# Altium PCB ffultra_pcb.PcbDoc (part 1 of 3)
Units mm, origin at the board's own origin, x right, y up, seen from the top; angles counter-clockwise.
Board outline 28 x 55 mm, 6 copper layers (Top, GND-T, Inner, Power, GND-B, Bottom), stack 1.538 mm thick; 121 components, 88 nets, 471 pads, 349 vias.
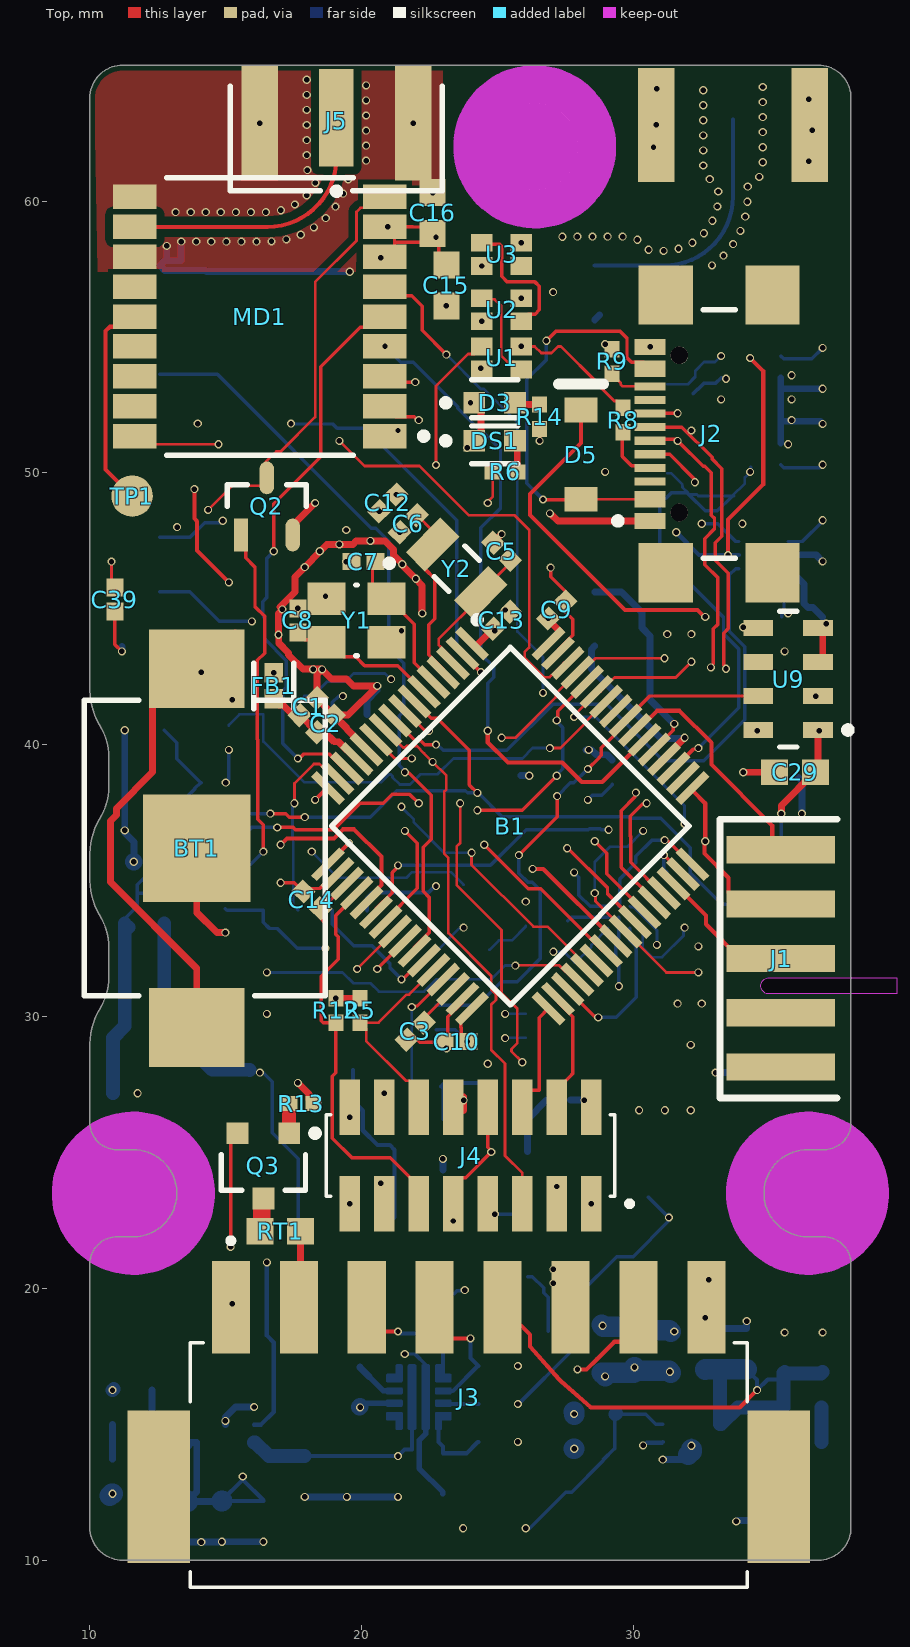
[diagram p0: Top view]
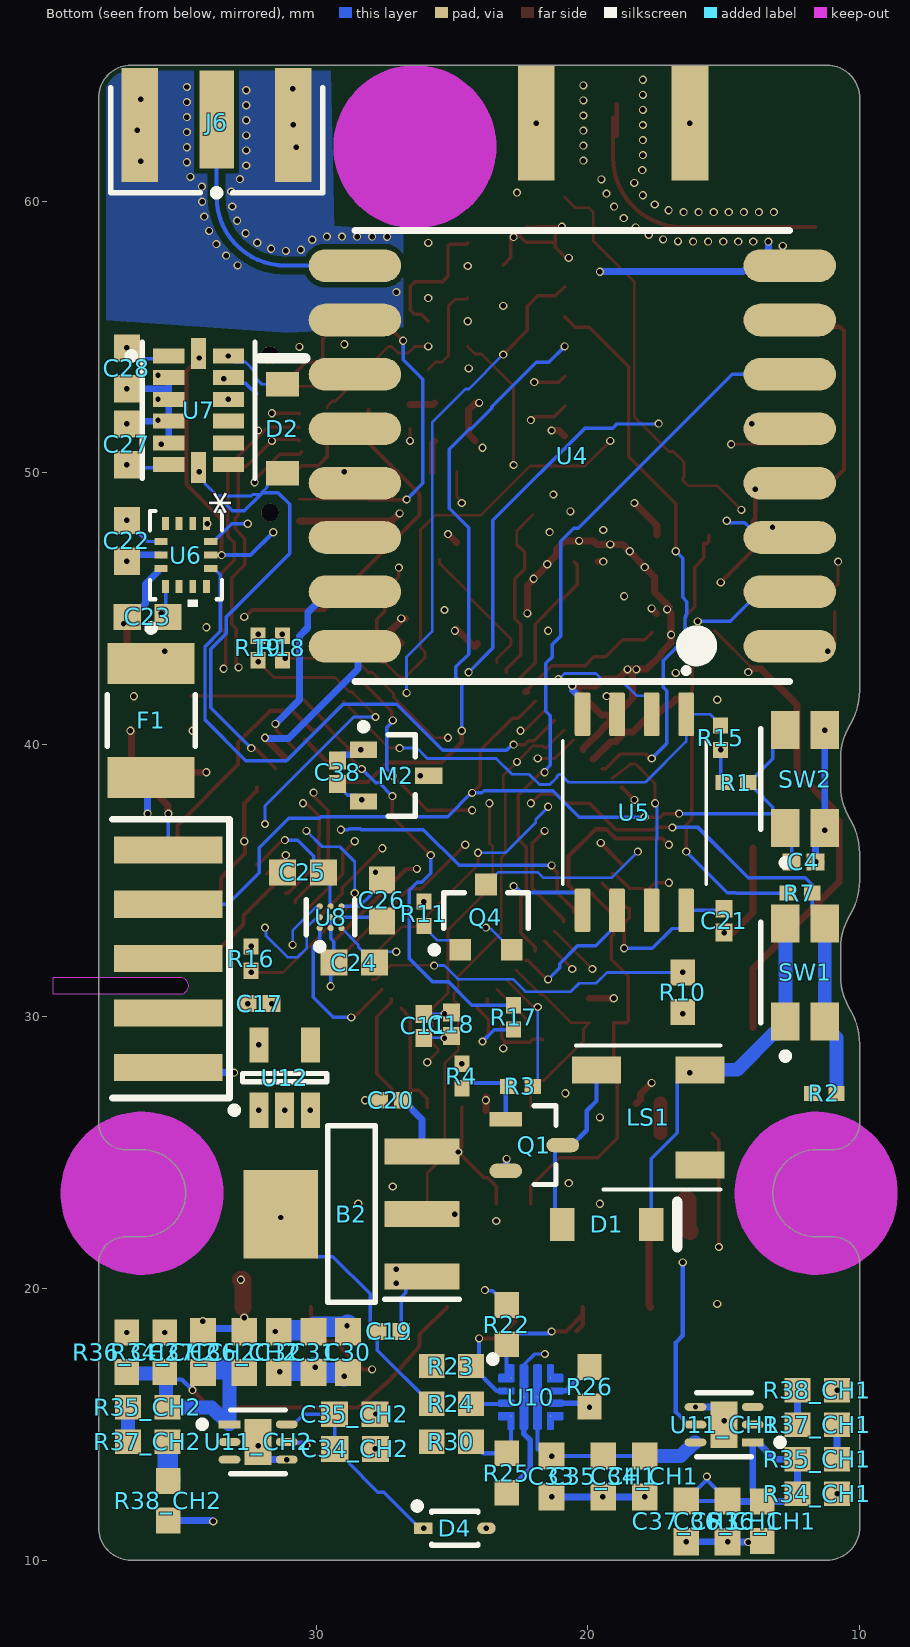
[diagram p1: Bottom view, seen from below]
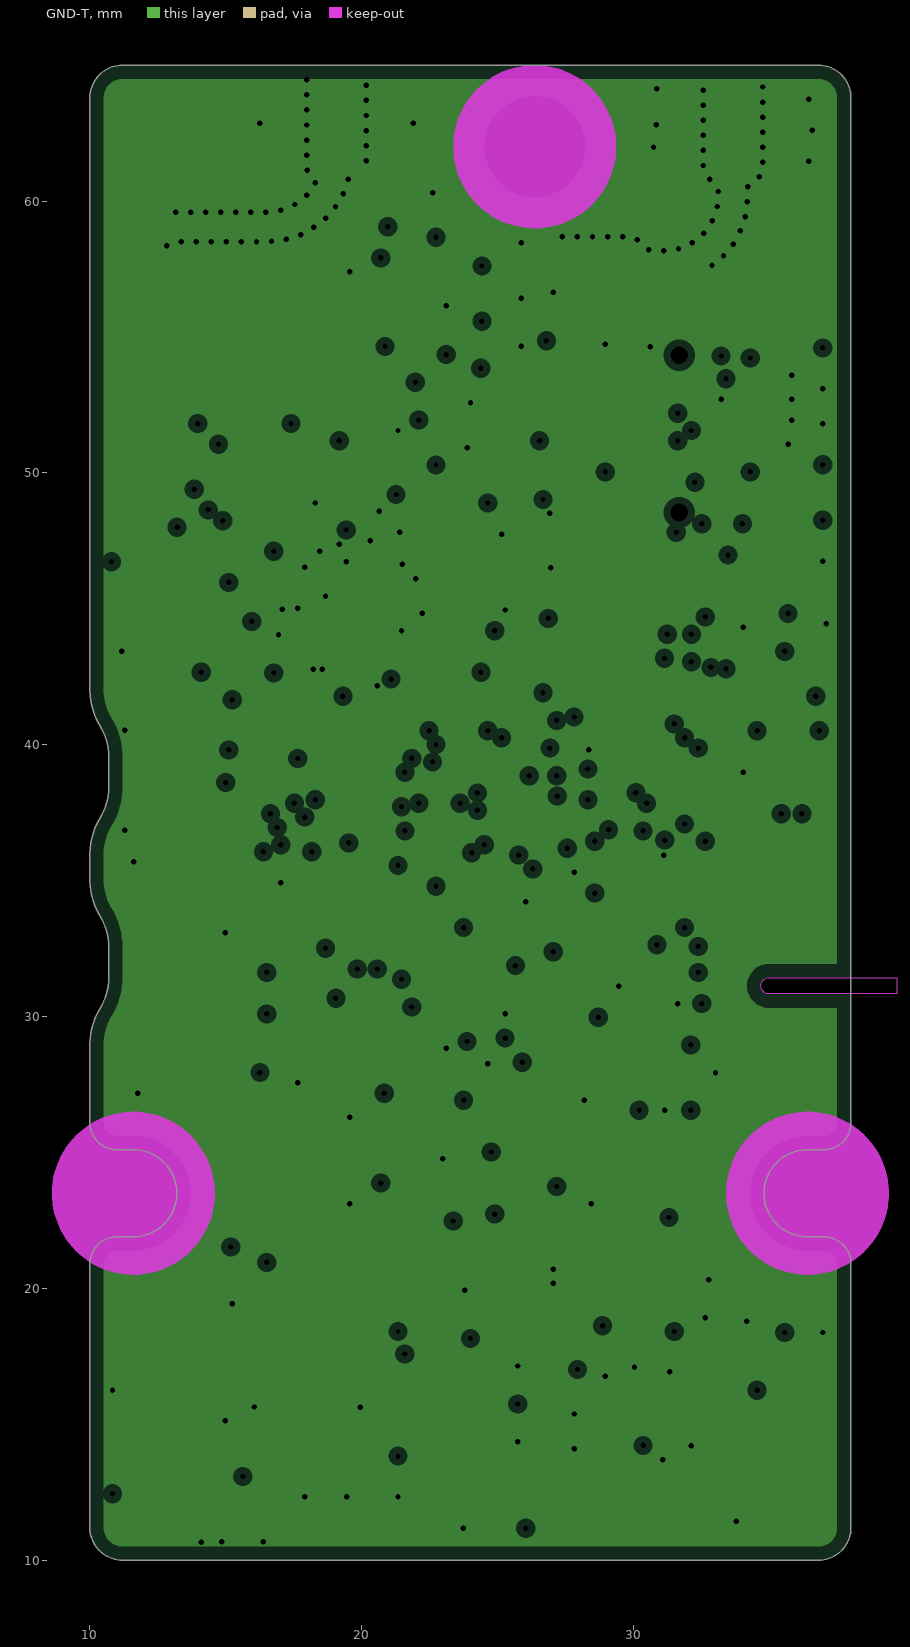
[diagram p2: GND-T, clearances drawn from the general rule]
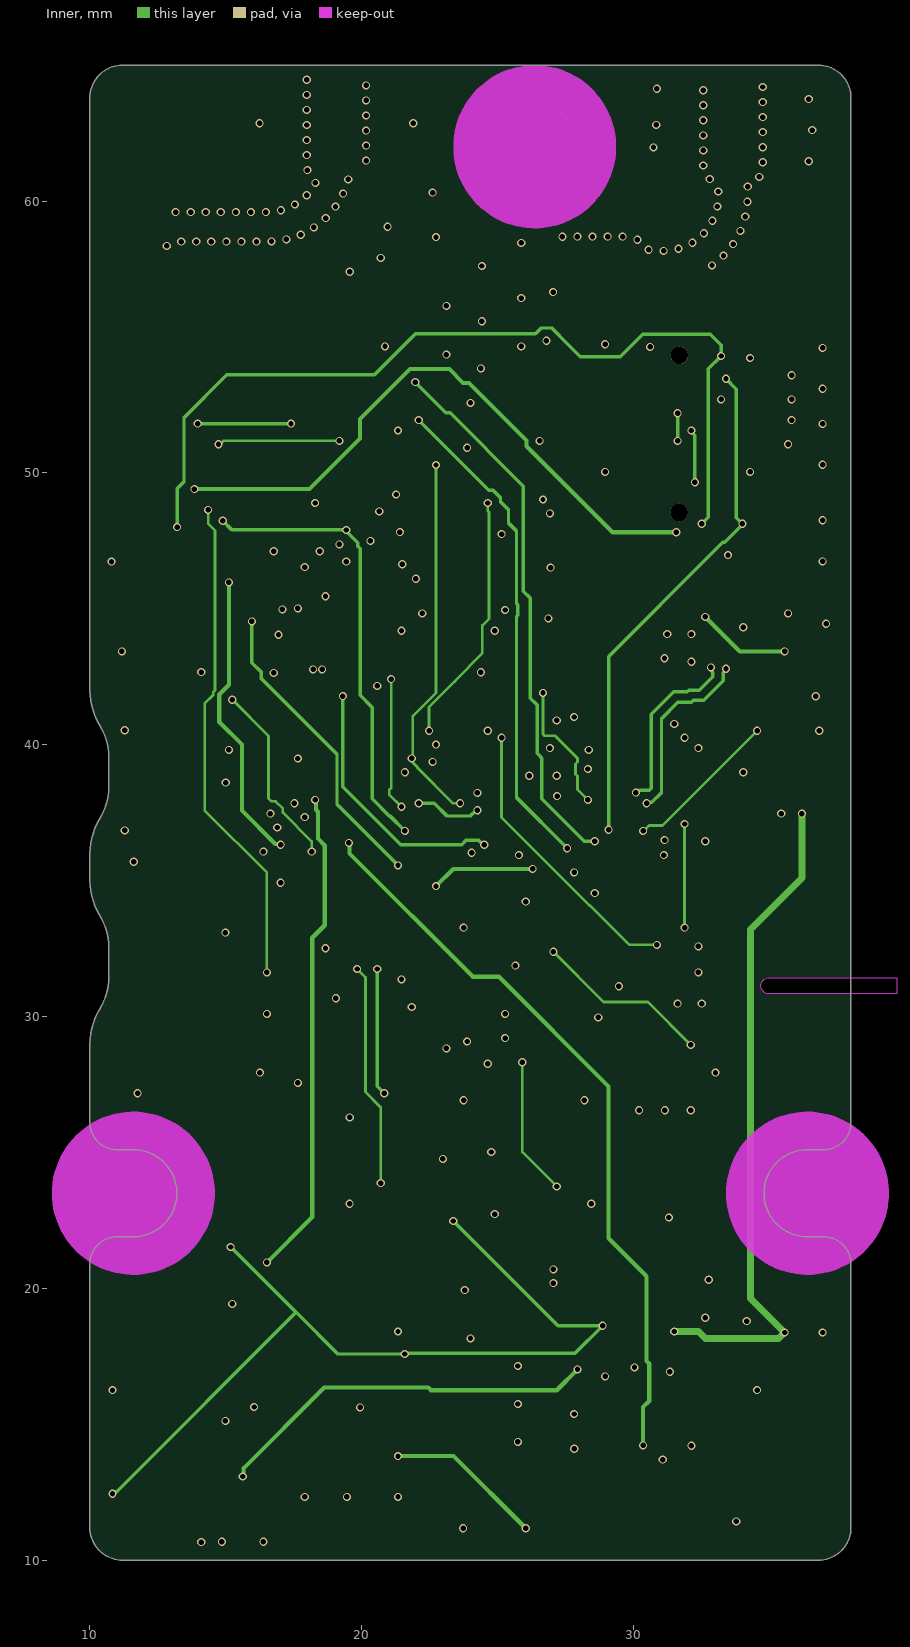
[diagram p3: Inner]
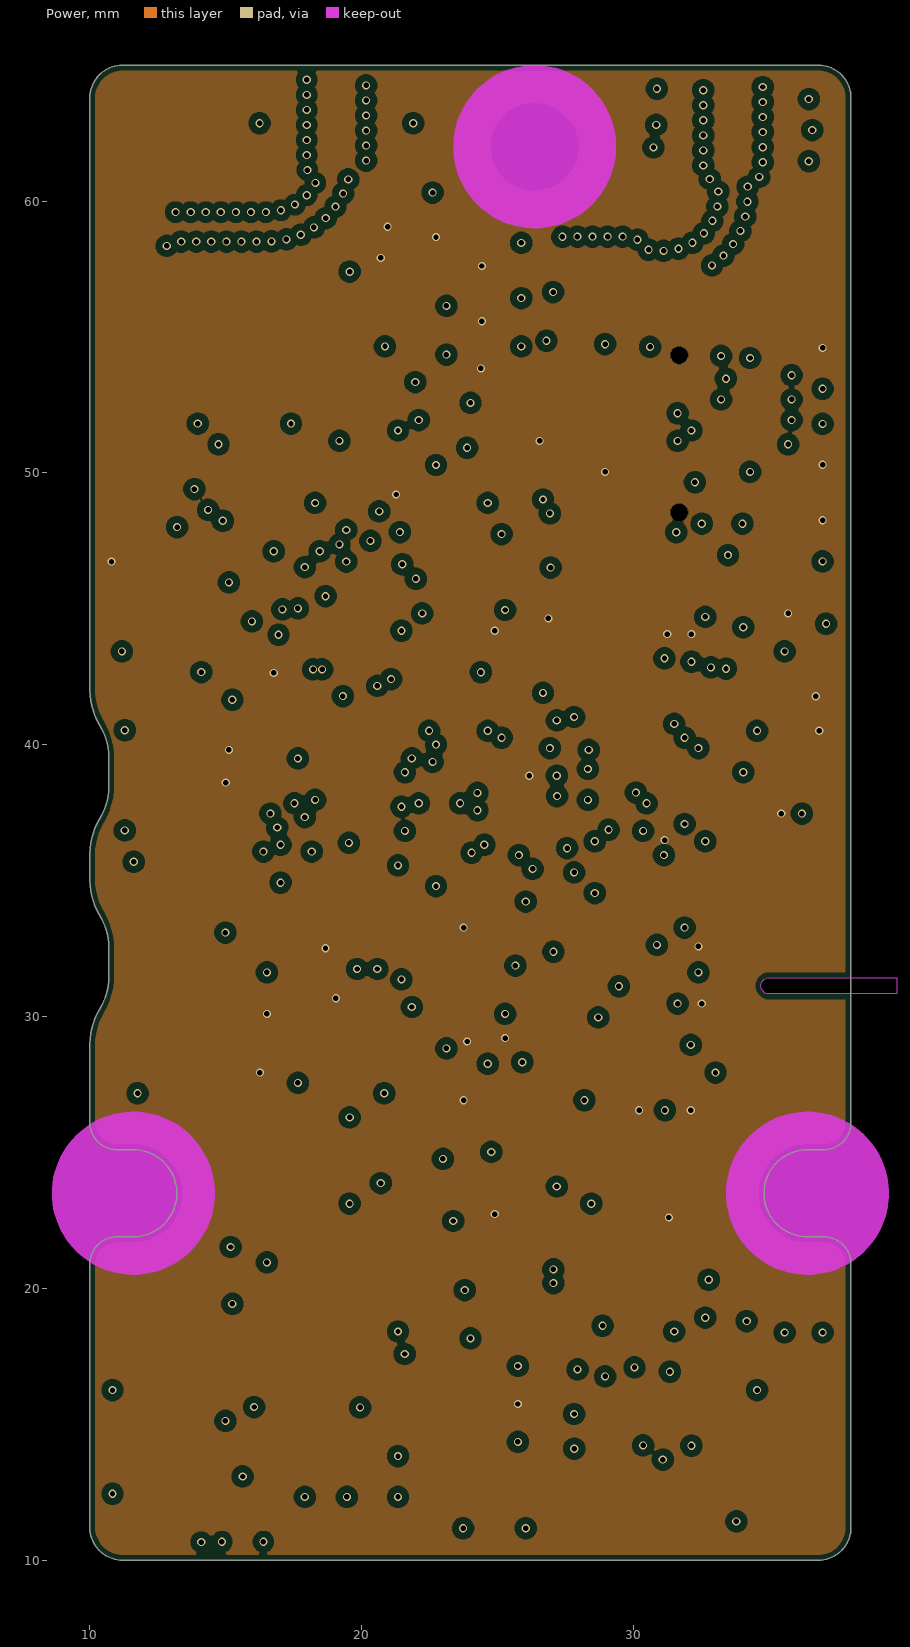
[diagram p4: Power]
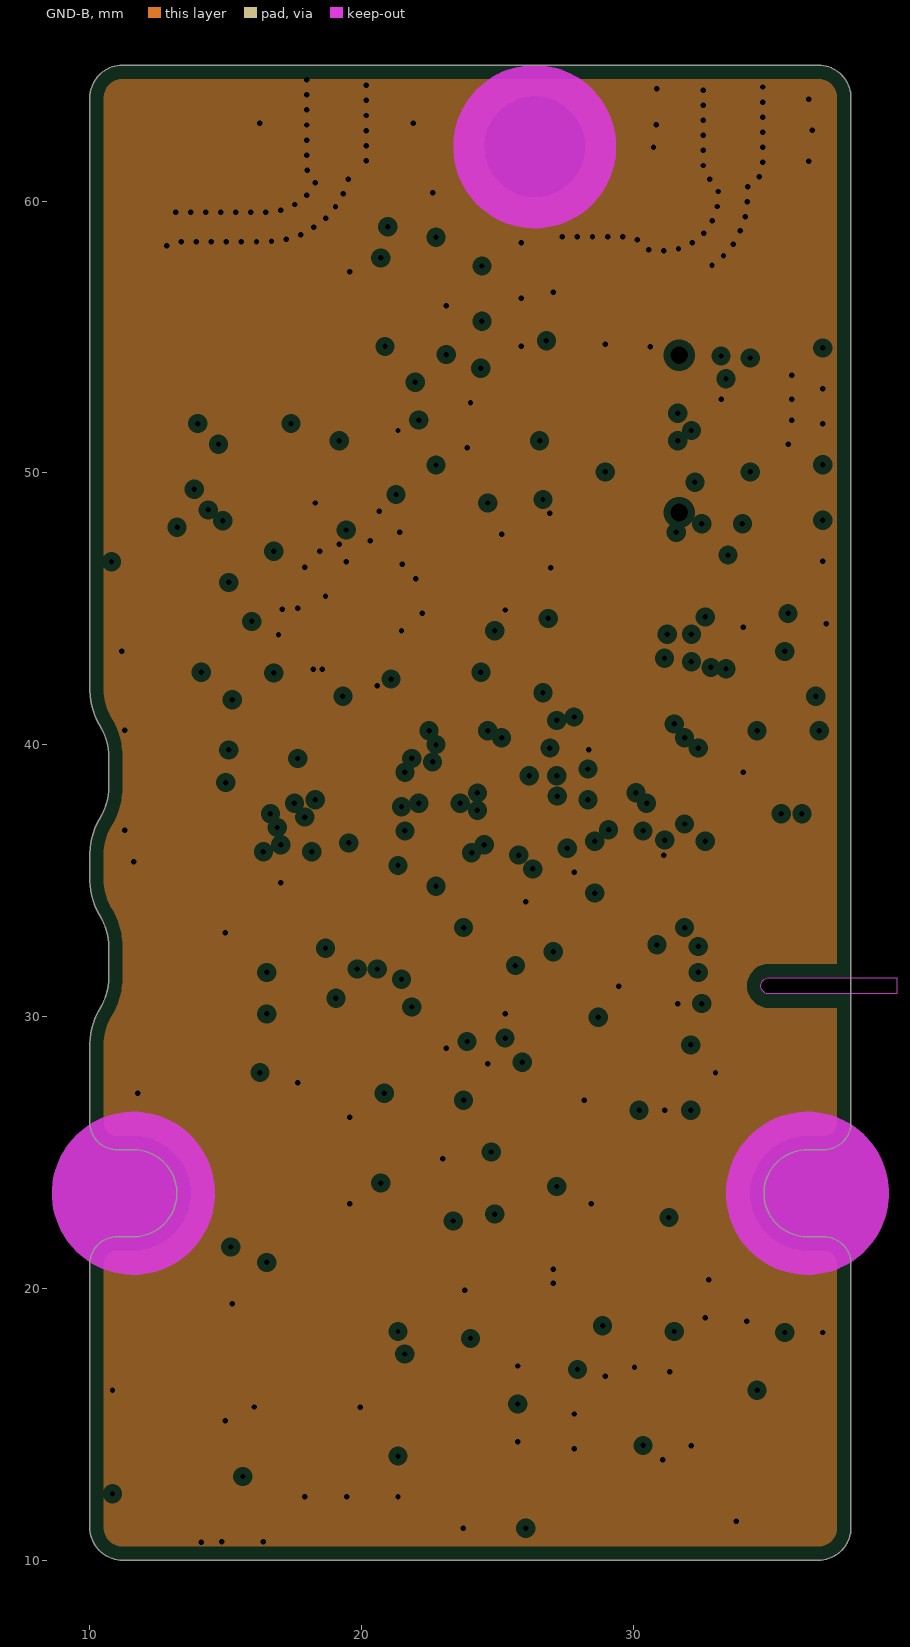
[diagram p5: GND-B, clearances drawn from the general rule]

## Layer stack, top to bottom
Top Solder: solder mask 0.0305, SM-001, Dk 3.8
Top: signal copper 0.035
Dielectric 4: prepreg 0.0994, 3313, Dk 4.05
GND-T: plane copper 0.0152, net GND
Dielectric 2: core 0.55, Core-009, Dk 4.6
Inner: signal copper 0.0152
Dielectric 1: prepreg 0.1088, 2116, Dk 4.25
Power: signal copper 0.0152
Dielectric 3: core 0.55, Core-009, Dk 4.6
GND-B: plane copper 0.0152, net GND
Dielectric 5: prepreg 0.0994, 3313, Dk 4.05
Bottom: signal copper 0.035
Bottom Solder: solder mask 0.0305, SM-001, Dk 3.8

## Board outline
10,26.1 10,29 cw(c12.407,29) 10.35,30.25 ccw(c8.293,31.5) 10.7,31.5 10.7,32.5 ccw(c8.293,32.5) 10.35,33.75 cw(c12.407,35) 10,35 10,36 cw(c12.407,36) 10.35,37.25 ccw(c8.293,38.5) 10.7,38.5 10.7,39.5 ccw(c8.293,39.5) 10.35,40.75 cw(c12.407,42) 10,42 10,63.8 cw(c11.2,63.8) 11.2,65 36.8,65 cw(c36.8,63.8) 38,63.8 38,26.1 cw(c37,26.1) 37,25.1 36.4,25.1 ccw(c36.4,23.5) 36.4,21.9 37,21.9 cw(c37,20.9) 38,20.9 38,11.2 cw(c36.8,11.2) 36.8,10 11.2,10 cw(c11.2,11.2) 10,11.2 10,20.9 cw(c11,20.9) 11,21.9 11.6,21.9 ccw(c11.6,23.5) 11.6,25.1 11,25.1 cw(c11,26.1)

## Design rules (kind name [scope] priority, off if disabled: settings)
BoardOutlineClearance [All] p1: gap=0.2 ignorepadtopadclearanceinfootprint=FALSE except(0: Text-OutlineEdge Text-CavityEdge Text-CutoutEdge Text-SplitBarrior Text-SplitContinuation)
Clearance [All] p1: gap=0.254 ignorepadtopadclearanceinfootprint=TRUE except(0: Arc-Hole Track-Hole SMDPad-Hole THPad-Hole Via-Hole Fill-Hole Poly-Hole Region-Hole Text-Hole; 0.09: Arc-Arc Arc-Track Track-Track; 0.127: SMDPad-SMDPad; 0.2: Arc-SMDPad Track-SMDPad SMDPad-Fill SMDPad-Poly SMDPad-Region Fill-Fill Fill-Poly Fill-Region Poly-Poly Poly-Region Region-Region; 0.33: Arc-THPad Track-THPad; 0.5: THPad-THPad)
DiffPairsRouting [All] p1: maxlimit=0.254 minlimit=0.09 mostfreqgap=0.254 toplayer_minwidth=0.09 toplayer_maxwidth=0.381 toplayer_prefwidth=0.254 midlayer2_minwidth=0.09 midlayer2_maxwidth=0.381 midlayer2_prefwidth=0.254 midlayer3_minwidth=0.09 midlayer3_maxwidth=0.381 midlayer3_prefwidth=0.254 bottomlayer_minwidth=0.09 bottomlayer_maxwidth=0.381 bottomlayer_prefwidth=0.254 maxuncoupledlength=12.7
HoleSize [All] p1: absolutevalues=TRUE maxlimit=6.3 minlimit=0.2 maxpercent=80.000 minpercent=20.000
MatchedLengths "Schematic Matched Net Lengths" [InNetClass('STLINK')] p1: tolerance=0.1 checknetsindiffpair=FALSE checkdiffpairvsdiffpair=TRUE checkxsignals=TRUE checkothers=TRUE
MinimumSolderMaskSliver [All] p1: minsoldermaskwidth=0.09
PlaneClearance [All] p1: clearance=0.254
PlaneConnect [All] p1: pad.planeconnectstyle=Relief pad.reliefexpansion=0.254 pad.reliefentries=4 pad.reliefconductorwidth=0.254 pad.reliefairgap=0.254 via.planeconnectstyle=Direct via.reliefexpansion=0.508 via.reliefentries=4 via.reliefconductorwidth=0.254 via.reliefairgap=0.254
PolygonConnect PolygonConnect_gnd_ant [IsNamedPolygon('GND_ANT')] p1: thpad.connectstyle=Relief thpad.reliefconductorwidth=0.254 thpad.reliefentries=4 thpad.polygonreliefangle="90 Angle" thpad.airgapwidth=0.254 smdpad.connectstyle=Relief smdpad.reliefconductorwidth=0.5 smdpad.reliefentries=4 smdpad.polygonreliefangle="90 Angle" smdpad.airgapwidth=0.127 via.connectstyle=Direct via.reliefconductorwidth=0.254 via.reliefentries=4 via.polygonreliefangle="90 Angle" via.airgapwidth=0.254
PolygonConnect [All] p2: thpad.connectstyle=Relief thpad.reliefconductorwidth=0.254 thpad.reliefentries=4 thpad.polygonreliefangle="90 Angle" thpad.airgapwidth=0.254 smdpad.connectstyle=Direct smdpad.reliefconductorwidth=0.254 smdpad.reliefentries=4 smdpad.polygonreliefangle="90 Angle" smdpad.airgapwidth=0.254 via.connectstyle=Direct via.reliefconductorwidth=0.254 via.reliefentries=4 via.polygonreliefangle="90 Angle" via.airgapwidth=0.254
RoutingVias [All] p1: holewidth=0.2 width=0.35 viastyle="Through Hole" minholewidth=0.15 minwidth=0.25 maxholewidth=0.711 maxwidth=1.27 useviatemplates=TRUE viatemplateguid#1={D842139F-6F32-4212-9B27-BAE97ACFDABE} viatemplateguid#2={DD1D606A-29FF-4885-8C69-D1AE082B58F4} viatemplatename#1=v30h20 viatemplatename#2=v35h20
SolderMaskExpansion SolderMaskExpansion_via [IsVia] p1: expansion=0.102 istentingtop=TRUE
SolderMaskExpansion [All] p2: expansion=0.05 istentingtop=FALSE
SupplyNets "Schematic Supply Nets_3" [InNet('1V8')] p1: voltage=0.000
SupplyNets "Schematic Supply Nets_5" [InNet('VBAT')] p2: voltage=0.000
SupplyNets "Schematic Supply Nets_2" [InNet('3V3')] p3: voltage=0.000
SupplyNets "Schematic Supply Nets_1" [InNet('GND')] p4: voltage=0.000
SupplyNets "Schematic Supply Nets" [InNet('VDDA')] p5: voltage=0.000
Width Width_ANT [InNet('GPS_ANT','RD_ANT')] p1: maxlimit=0.154 minlimit=0.132 preferedwidth=0.154 toplayer_minwidth=0.154 bottomlayer_minwidth=0.154 impedanceprofiledriven=TRUE impedanceprofileid={4A9DADD4-1E54-47D4-9708-552C67BF1AE2} impedanceprofilevalue=50.000000 minimp=50.000000 maximp=50.000000 favimp=50.000000
Width [All] p2: maxlimit=0.76 minlimit=0.1 preferedwidth=0.254 minimp=50.000000 maximp=50.000000 favimp=50.000000
25 further rules are at their usual default settings.

## Classes and differential pairs
channel class ffultra_p2_channel: CH1 CH2
component class PyroDesignator: R22 R23
component class Pressure: C29 U9
component class P1: C30 C31 C32 C33 D4 R24 R25 R26 R30 U10
component class IMU: C22 C23 C24 C25 C26 C27 C28 D2 U6 U7 U8 U12
component class CH2: C34_CH2 C35_CH2 C36_CH2 C37_CH2 R34_CH2 R35_CH2 R36_CH2 R37_CH2 R38_CH2 U11_CH2
component class CH1: C34_CH1 C35_CH1 C36_CH1 C37_CH1 R34_CH1 R35_CH1 R36_CH1 R37_CH1 R38_CH1 U11_CH1
net class STLINK: SWCLK SWDIO SWO
net class QSPI: "Flash CLK" "Flash IO 0" "Flash IO 1" "Flash IO 2" "Flash IO 3" "Flash NCS"
component class Storage: C21 R15 U5
component class Power: B2 C19 C20 D3 D5 F1 Q3 R13 R14 RT1
component class Wireless: BT1 C15 C16 C17 C18 C38 C39 J5 J6 M2 MD1 Q2 Q4 R7 R10 R11 TP1 U4
component class Connectors: 32 J2 J3 J4 R8 R9
component class MCU: B1 C1 C2 C3 C4 C5 C6 C7 C8 C9 C10 C11 C12 C13 C14 D1 DS1 FB1 J1 LS1 Q1 R1 R2 R3 R4 R5 R6 R12 R16 R17 R18 R19 SW1 SW2 U1 U2 U3 Y1 Y2
differential pair USB_Data: +USB_Data_P -USB_Data_N

## Components (designator, comment, footprint, x,y, rotation, side; value= is the part's Value field where it differs from the comment)
B1 "STM32F412RGT6" QFP50P1200X1200X160-64N 25.467,37.01 r315 top
B2 "LDL1117S33R" SOT230P700X180-4N 28.702,22.733 r0 bottom
BT1 "3030" FP-3030-MFG 14.224,36.195 r90 top
C1 "CL05B104KO5NNNC" CAP-0402 18.034,41.402 r225 top value=100nF
C2 "CL05A105KA5NQNC" CAP-0402 18.669,40.767 r225 top value=1µF
C3 "CL05A475MP5NRNC" CAP-0402 21.971,29.464 r45 top value=4.7µF
C4 "CL05B104KO5NNNC" CAP-0402 12.065,35.687 r0 bottom value=100nF
C5 "C1005NP0439CGTS" CAP-0402 25.146,47.117 r315 top value=4.3pF
C6 "C1005NP0439CGTS" CAP-0402 21.717,48.133 r45 top value=4.3pF
C7 "0402CG6R0C500NT" CAP-0402 20.066,46.736 r0 top value=6pF
C8 "0402CG6R0C500NT" CAP-0402 17.653,44.577 r270 top value=6pF
C9 "CL05A475MP5NRNC" CAP-0402 27.178,44.958 r225 top value=4.7µF
C10 "CL05B104KO5NNNC" CAP-0402 23.495,29.083 r0 top value=100nF
C11 "CL05B104KO5NNNC" CAP-0402 26.035,29.659 r270 bottom value=100nF
C12 "CL05B104KO5NNNC" CAP-0402 20.955,48.895 r45 top value=100nF
C13 "CL05B104KO5NNNC" CAP-0402 25.146,44.577 r225 top value=100nF
C14 "CL05B104KO5NNNC" CAP-0402 18.161,34.29 r315 top value=100nF
C15 "CL10A106KP8NNNC" CAP-0603 23.114,56.896 r90 top value=100pF
C16 "CC0603KRX7R9BB104" CAP-0603 22.606,59.563 r270 top value=100nF
C17 "CL05A106MQ5NUNC" CAP-0402 32.072,30.48 r0 bottom value=10µF
C18 "CL05B104KO5NNNC" CAP-0402 25.019,29.718 r270 bottom value=100nF
C19 "CL05A475MP5NRNC" CAP-0402 27.305,18.415 r0 bottom value=4.7µF
C20 "CL05A105KA5NQNC" CAP-0402 27.246,26.924 r180 bottom value=1µF
C21 "CL05B104KO5NNNC" CAP-0402 14.986,33.528 r90 bottom value=100nF
C22 "CC0603KRX7R9BB104" CAP-0603 36.957,47.498 r90 bottom value=100nF
C23 "CC0603KRX7R9BB104" CAP-0603 36.195,44.704 r180 bottom value=100nF
C24 "CC0603KRX7R9BB104" CAP-0603 28.594,31.985 r180 bottom value=100nF
C25 "CC0603KRX7R9BB104" CAP-0603 30.48,35.306 r180 bottom value=100nF
C26 "CL10A225KO8NNNC" CAP-0603 27.578,34.271 r270 bottom value=2.2µF
C27 "CL10A105KB8NNNC" CAP-0603 36.957,51.054 r270 bottom value=1µF
C28 "CC0603KRX7R9BB104" CAP-0603 36.957,53.848 r90 bottom value=100nF
C29 "CC0603KRX7R9BB104" CAP-0603 35.941,38.989 r0 top value=100nF
C30 "CL10A226MQ8NRNC" CAP-0603 28.829,17.653 r90 bottom value=22µF
C31 "CL10A226MQ8NRNC" CAP-0603 30.099,17.653 r90 bottom value=22µF
C32 "CL10A105KB8NNNC" CAP-0603 31.369,17.653 r90 bottom value=1µF
C33 "CL10A225KO8NNNC" CAP-0603 21.336,13.081 r90 bottom value=2.2µF
C34_CH1 "CL10A226MQ8NRNC" CAP-0603 17.907,13.081 r90 bottom value=22µF (schematic designator C34)
C34_CH2 "CL10A226MQ8NRNC" CAP-0603 28.563,14.097 r0 bottom value=22µF (schematic designator C34)
C35_CH1 "CL10A226MQ8NRNC" CAP-0603 19.431,13.081 r90 bottom value=22µF (schematic designator C35)
C35_CH2 "CL10A226MQ8NRNC" CAP-0603 28.575,15.367 r0 bottom value=22µF (schematic designator C35)
C36_CH1 "CL10A225KO8NNNC" CAP-0603 14.859,11.43 r90 bottom value=2.2µF (schematic designator C36)
C36_CH2 "CL10A225KO8NNNC" CAP-0603 32.639,17.653 r270 bottom value=2.2µF (schematic designator C36)
C37_CH1 "CL10A225KO8NNNC" CAP-0603 16.383,11.43 r90 bottom value=2.2µF (schematic designator C37)
C37_CH2 "CL10A225KO8NNNC" CAP-0603 34.163,17.653 r270 bottom value=2.2µF (schematic designator C37)
C38 "GRM155C71A105KE11D" CAP-0402 29.21,38.989 r90 bottom value=1µF
C39 "GRM155C71A105KE11D" CAP-0402 10.922,45.339 r270 top value=1µF
D1 "SM4007PL-TP" MCC-SOD-123FL_V 19.304,22.352 r180 bottom
D2 "SM4007PL-TP" MCC-SOD-123FL_V 31.238,51.625 r90 bottom
D3 "Red LED" FP-LTST-C190GKT-MFG 24.892,52.578 r0 top
D4 "1N5819WS" FP-477-02-IPC_C 24.892,11.176 r180 bottom
D5 "SM4007PL-TP" MCC-SOD-123FL_V 28.067,50.673 r90 top
DS1 "Red LED" FP-LTST-C190GKT-MFG 24.892,51.181 r0 top
F1 "MF-MSMF050" BOUR-MF-MSMF050-2_V 36.068,40.894 r270 bottom
FB1 "BLM15AG601SN1D" FP-BLM15-0_05-IPC_A 16.764,42.164 r90 top
J1 "009159010061911" 009159010061911-Footprint-1 35.687,32.131 r270 top
J2 "TYPE-C16PQTWT" FP-USB4110-GF-A-MFG 34.29,51.435 r90 top
J3 "1771088" PHOENIX_1771088 13.686,9.004 r0 top
J4 "20021321-00016C4LF" AMPHENOL_20021321-00016C4LF 24.003,24.889 r0 top
J5 "SMA-J-P-H-ST-EM1" FP-SMA-J-P-H-ST-EM1-MFG 19.07,69.725 r180 top
J6 "SMA-J-P-H-ST-EM1" FP-SMA-J-P-H-ST-EM1-MFG 33.659,69.665 r0 bottom
LS1 "MLT-5020" MLT-5020 17.78,26.289 r0 bottom
M2 "XC6206P332MR-G" SOT95P245X110-3N 27.051,38.862 r180 bottom
MD1 "TESEO-LIV4F" FP-LCC-18-MFG 16.256,55.753 r180 top
Q1 "AO3400A" FP-SOT23-IPC_C 21.971,25.273 r180 bottom
Q2 "AO3400A" FP-SOT23-IPC_C 16.51,48.768 r90 top
Q3 "AO3401A" AO-SOT-23-3L_V 16.383,24.511 r270 top
Q4 "AO3401A" AO-SOT-23-3L_V 23.749,33.655 r90 bottom
R1 "0402WGF1002TCE" RES-0402 14.547,38.608 r0 bottom value=10k
R2 "0402WGF1002TCE" RES-0402 11.303,27.178 r180 bottom value=10k
R3 "0402WGF3000TCE" RES-0402 22.479,27.432 r0 bottom value=300
R4 "0402WGF1002TCE" RES-0402 24.638,27.813 r270 bottom value=10k
R5 "0402WGF2201TCE" RES-0402 19.939,30.226 r90 top value=2.2k
R6 "0402WGF2200TCE" RES-0402 25.273,50.038 r180 top value=220
R7 "0402WGF1002TCE" RES-0402 12.196,34.544 r180 bottom value=10k
R8 "0402WGF5101TCE" RES-0402 29.616,51.943 r270 top value=5.1k
R9 "0402WGF5101TCE" RES-0402 29.21,54.102 r270 top value=5.1k
R10 "0603WAF0000T5E" RES-0603 16.51,30.898 r90 bottom value=1k
R11 "0402WGF1002TCE" RES-0402 26.035,33.782 r270 bottom value=10k
R12 "0402WGF2201TCE" RES-0402 19.05,30.226 r90 top value=2.2k
R13 "0402WGF1002TCE" RES-0402 17.78,26.797 r180 top value=10k
R14 "0402WGF2200TCE" RES-0402 26.543,52.07 r270 top value=220
R15 "0402WGF1002TCE" RES-0402 15.113,40.259 r270 bottom value=10k
R16 "0402WGF2201TCE" RES-0402 32.385,32.131 r90 bottom value=2.2k
R17 "0402WGF2201TCE" RES-0402 22.733,29.972 r270 bottom value=2.2k
R18 "0402WGF2201TCE" RES-0402 31.242,43.561 r90 bottom value=2.2k
R19 "0402WGF2201TCE" RES-0402 32.131,43.561 r90 bottom value=2.2k
R22 "0603WAF1002T5E" RES-0603 22.987,18.669 r270 bottom value=10k
R23 "0603WAF1002T5E" RES-0603 25.019,17.145 r180 bottom value=10k
R24 "0603WAF1002T5E" RES-0603 25.019,15.748 r0 bottom value=10k
R25 "0603WAF4702T5E" RES-0603 22.987,13.208 r270 bottom value=47k
R26 "0603WAF6800T5E" RES-0603 19.939,16.383 r90 bottom value=680
R30 "0603WAF1002T5E" RES-0603 25.019,14.351 r180 bottom value=10k
R34_CH1 "0603WAF4702T5E" RES-0603 11.557,12.446 r180 bottom value=47k (schematic designator R34)
R34_CH2 "0603WAF4702T5E" RES-0603 35.56,17.653 r90 bottom value=47k (schematic designator R34)
R35_CH1 "0603WAF4702T5E" RES-0603 11.557,13.716 r0 bottom value=47k (schematic designator R35)
R35_CH2 "0603WAF4702T5E" RES-0603 36.195,15.621 r180 bottom value=47k (schematic designator R35)
R36_CH1 "0603WAF4702T5E" RES-0603 13.589,11.43 r90 bottom value=47k (schematic designator R36)
R36_CH2 "0603WAF4702T5E" RES-0603 36.957,17.653 r270 bottom value=47k (schematic designator R36)
R37_CH1 "0603WAF2202T5E" RES-0603 11.557,14.986 r180 bottom value=22k (schematic designator R37)
R37_CH2 "0603WAF2202T5E" RES-0603 36.195,14.351 r0 bottom value=22k (schematic designator R37)
R38_CH1 "0603WAF1002T5E" RES-0603 11.557,16.256 r0 bottom value=10k (schematic designator R38)
R38_CH2 "0603WAF1002T5E" RES-0603 35.433,12.192 r90 bottom value=10k (schematic designator R38)
RT1 "2A Fuse" THRMC1608X95N 17.001,22.098 r180 top
SW1 "EVQ-P7A01P" FP-EVQ-P7A01P-MFG 11.684,31.623 r90 bottom
SW2 "EVQ-P7A01P" FP-EVQ-P7A01P-MFG 11.684,38.735 r90 bottom
TP1 "TP-1.5" TP-1.5-Footprint-1 11.557,49.149 r0 top
U1 "XL-1615RGBC-WS2812B" XL-1615RGBC-WS2812B-Footprint-1 25.146,54.229 r180 top
U2 "XL-1615RGBC-WS2812B" XL-1615RGBC-WS2812B-Footprint-1 25.146,56.007 r180 top
U3 "XL-1615RGBC-WS2812B" XL-1615RGBC-WS2812B-Footprint-1 25.146,58.039 r180 top
U4 "LoRa-CC68-868-TCXO" LoRa-CC68-868-TCXO-Footprint-1 20.573,50.626 r0 bottom
U5 "W25Q128JVSIQ" SOIC127P790X216-8N 18.288,37.514 r270 bottom
U6 "BMI323" BMI323_BOS 34.786,46.977 r270 bottom
U7 "ADXL375BCCZ-RL7" FP-CC-14-1-MFG 34.32,52.303 r180 bottom
U8 "BMM350" FP-BMM350-IPC_B 29.464,33.655 r90 bottom
U9 "MS560702BA03-50" TECO-MS560702BA03-50_V 35.687,42.418 r180 top
U10 "TPS22811LRPWR" TPS22811LRPWR-Footprint-1 22.102,16.002 r180 bottom
U11_CH1 "TPS22810DRVR" FP-DRV0006A-IPC_A 14.986,14.986 r0 bottom (schematic designator U11)
U11_CH2 "TPS22810DRVR" FP-DRV0006A-IPC_A 32.131,14.351 r180 bottom (schematic designator U11)
U12 "TPS76318DBVRG4" TI-DBV5_M 31.156,27.756 r90 bottom
Y1 "NX3225GA-16.000M-STD-CRG-2" FP-NX3225GA-MFG 19.812,44.577 r180 top value=8pF
Y2 "NX3215SA-32.768KHZ-EXS00A-MU00746" FP-NX3215SA-MFG 23.495,46.482 r135 top value=7pF

## Footprints (in the part's own frame and the unit in brackets; to place one, negate y for a bottom-side part, rotate by r counter-clockwise, add the part's x,y. Pads: shape width x height; smd on the part's side, far side on the other; paste and mask are expansions set on the pad)
009159010061911-Footprint-1 [mm]
  rect 1x4 smd: 1(3.991,-0.266) 2(1.991,-0.266) 3(-0.009,-0.266) 4(-2.009,-0.266) 5(-4.009,-0.266)
  rect 1x4 smd far side: 6(4,-0.25) 7(2,-0.25) 8(0,-0.25) 9(-2,-0.25) 10(-4,-0.25)
  Keep-Out Layer board cut-out: 0.7,4 1.3,4 1.3,-0.7 1.27,-0.83 1.187,-0.935 1.067,-0.992 0.933,-0.992 0.813,-0.935 0.73,-0.83 0.7,-0.7 0.7,-0.7
  silkscreen extent -5.13,-2.5 5.13,1.8, body extent -5,-1.2 5,8.8, height 1.7
AMPHENOL_20021321-00016C4LF [mm]
  rect 0.76x2.05 smd: 1(4.445,-1.775) 2(4.445,1.775) 3(3.175,-1.775) 4(3.175,1.775) 5(1.905,-1.775) 6(1.905,1.775) 7(0.635,-1.775) 8(0.635,1.775) 9(-0.635,-1.775) 10(-0.635,1.775) 11(-1.905,-1.775) 12(-1.905,1.775) 13(-3.175,-1.775) 14(-3.175,1.775) 15(-4.445,-1.775) 16(-4.445,1.775)
  silkscreen extent -5.31,-1.87 5.95,1.5, body extent -5.31,-2.25 5.31,2.25, height 4.65
AO-SOT-23-3L_V [mm] "SOT23, 3-Leads, Body 3.1x1.8mm, Pitch 0.95mm"
  rect 0.8x0.8 smd: 1(-1.2,0.95) 2(-1.2,-0.95) 3(1.2,0)
  silkscreen extent -1.32,-1.55 0.9,2.03, body extent -1.5,-1.55 1.5,1.55, height 1.25
BMI323_BOS [mil]
  rect 19x10 smd paste+0 mask+0: 1(-45.5,29.53) 2(-45.5,9.84) 3(-45.5,-9.84) 4(-45.5,-29.53) 8(45.5,-29.53) 9(45.5,-9.84) 10(45.5,9.84) 11(45.5,29.53)
  rect 10x19 smd paste+0 mask+0: 5(-19.68,-36) 6(0,-36) 7(19.68,-36) 12(19.68,36) 13(0,36) 14(-19.68,36)
  silkscreen extent -64,-52 75,52, body extent -59,-47 59,47, height 34
BOUR-MF-MSMF050-2_V [mm] "SMD, 2-Leads, Body 4.55x3.24mm"
  rect 1.5x3.2 smd: 1(-2.1,0) 2(2.1,0)
  silkscreen extent -3.52,-1.62 0.95,1.62, body extent -2.27,-1.62 2.27,1.62, height 0.85
CAP-0402 [mm] "Chip Capacitor, 2-Leads, Body 1.00x0.50mm, IPC Medium Density"
  rect 0.66x0.62 smd: 1(-0.44,0) 2(0.44,0)
  body extent -0.53,-0.28 0.53,0.28, height 0.55
CAP-0603 [mm] "jlcpcb 0603 capacitor footprint, medium density, IPC compliant"
  rect 1x0.95 smd: 1(-0.75,0) 2(0.75,0)
  body extent -0.85,-0.45 0.85,0.45, height 0.9
FP-477-02-IPC_C [mm]
  rect 0.686x0.436 smd paste+0 mask+0: 1(-1.16,0)
  rrect100% 0.686x0.436 smd paste+0 mask+0: 2(1.16,0)
  silkscreen extent -1.51,-0.63 0.85,0.94, body extent -1.25,-0.63 1.25,0.63, height 1.1
FP-3030-MFG [mm]
  rect 3.96x3.96 smd paste-1000 mask+0: 1(0,0.292)
  rect 2.9x3.5 smd paste+0 mask+0: 2(-6.6,0.292) 2(6.6,0.292)
  silkscreen extent -5.44,-4.43 5.44,4.43, body extent -8.05,-4.3 8.05,4.3, height 3.2
FP-BLM15-0_05-IPC_A [mm]
  rect 0.715x0.672 smd paste+0 mask+0: 1(-0.479,0) 2(0.479,0)
  silkscreen extent -0.84,-0.74 0.84,0.74, body extent -1.04,-0.54 1.04,0.54, height 0.25
FP-BMM350-IPC_B [mm]
  round 0.229 smd paste+0 mask+0: A1(-0.4,0.4) A2(0,0.4) A3(0.4,0.4) B1(-0.4,0) B2(0,0) B3(0.4,0) C1(-0.4,-0.4) C2(0,-0.4) C3(0.4,-0.4)
  silkscreen extent -1.2,-0.89 0.64,0.89, body extent -0.64,-0.64 0.64,0.64, height 0.54
FP-CC-14-1-MFG [mm]
  rect 1.145x0.55 smd paste+0 mask+0: 1(-1.098,2) 2(-1.098,1.2) 3(-1.098,0.4) 4(-1.098,-0.4) 5(-1.098,-1.2) 6(-1.098,-2) 8(1.098,-2) 9(1.098,-1.2) 10(1.098,-0.4) 11(1.098,0.4) 12(1.098,1.2) 13(1.098,2)
  rect 0.55x1.145 smd paste+0 mask+0: 7(0,-2.097) 14(0,2.097)
  silkscreen extent -2.6,-2.5 2.07,2.5, body extent -1.5,-2.5 1.5,2.5, height 1
FP-DRV0006A-IPC_A [mm]
  rect 0.806x0.292 smd paste+0 mask+0: 1(-1.053,0.65)
  rrect100% 0.806x0.292 smd paste+0 mask+0: 2(-1.053,0) 3(-1.053,-0.65) 4(1.053,-0.65) 5(1.053,0) 6(1.053,0.65)
  rect 1x1.7 smd paste-1000 mask+0: 7(0,0)
  silkscreen extent -2.18,-1.17 1,1.17, body extent -1,-1 1,1, height 0.8
FP-EVQ-P7A01P-MFG [mm]
  rect 1.4x1.05 smd paste+0 mask+0: 1(-1.8,1.05) 1'(1.8,1.05) 2(-1.8,-0.4) 2'(1.8,-0.4)
  silkscreen extent -3.2,0.93 1.85,1.95, body extent -2.35,-1.75 2.35,1.8, height 1.36
FP-LCC-18-MFG [mm]
  rect 1.6x0.9 smd paste+0 mask+0: 1(-4.6,4.4) 2(-4.6,3.3) 3(-4.6,2.2) 4(-4.6,1.1) 5(-4.6,0) 6(-4.6,-1.1) 7(-4.6,-2.2) 8(-4.6,-3.3) 9(-4.6,-4.4) 10(4.6,-4.4) 11(4.6,-3.3) 12(4.6,-2.2) 13(4.6,-1.1) 14(4.6,0) 15(4.6,1.1) 16(4.6,2.2) 17(4.6,3.3) 18(4.6,4.4)
  silkscreen extent -6.15,-5.1 3.42,5.1, body extent -4.85,-5.05 4.85,5.05, height 2.33
FP-LTST-C190GKT-MFG [mm]
  rect 0.8x0.8 smd paste+0 mask+0: 1(-0.75,0) 2(0.75,0)
  silkscreen extent -1.92,-0.85 0.85,0.85, body extent -1.25,-0.55 1.25,0.55, height 0.25
FP-NX3215SA-MFG [mm]
  rect 1x1.8 smd paste+0 mask+0: 1(-1.25,0) 2(1.25,0)
  silkscreen extent -0.38,-0.8 0.38,0.8, body extent -1.85,-1 1.85,1, height 0.25
FP-NX3225GA-MFG [mm]
  rect 1.4x1.2 smd paste+0 mask+0: 1(-1.1,-0.8) 2(1.1,-0.8) 3(1.1,0.8) 4(-1.1,0.8)
  silkscreen extent -1.33,-2.22 0.03,1.3, body extent -1.9,-1.5 1.9,1.5, height 0.25
FP-SMA-J-P-H-ST-EM1-MFG [mm]
  rect 1.27x3.6 smd paste+0 mask+0: 1(0,6.66)
  rect 1.35x4.2 smd paste+0 mask+0: 2(-2.825,6.86) 3(2.825,6.86)
  rect 1.35x4.2 smd far side paste+0 mask+0: 4(-2.825,6.86) 5(2.825,6.86)
  silkscreen extent -3.9,5.5 3.9,9.48, body extent -3.18,-5.26 3.18,8.07, height 3.81
FP-SOT23-IPC_C [mm]
  rect 1.205x0.532 smd paste+0 mask+0: 1(-1.05,0.95)
  rrect100% 1.205x0.532 smd paste+0 mask+0: 2(-1.05,-0.95) 3(1.05,0)
  silkscreen extent 0,-1.45 0.8,1.45, body extent -1.41,-1.45 1.41,1.45, height 1.25
FP-USB4110-GF-A-MFG [mm]
  rect 2.18x2 smd paste+0 mask+0: 1(-5.11,3.105) 2(5.11,3.105) 3(-5.11,-0.825) 4(5.11,-0.825)
  rect 0.6x1.15 smd paste+0 mask+0: A1-B12(-3.2,3.68) A4-B9(-2.4,3.68) B1-A12(3.2,3.68) B4-A9(2.4,3.68)
  rect 0.3x1.15 smd paste+0 mask+0: A5(-1.25,3.68) A6(-0.25,3.68) A7(0.25,3.68) A8(1.25,3.68) B5(1.75,3.68) B6(0.75,3.68) B7(-0.75,3.68) B8(-1.75,3.68)
  round 0.65 hole 0.65 unplated paste-2539.97 mask+0: M1(2.89,2.605) M2(-2.89,2.605)
  silkscreen extent -4.57,0.55 4.57,4.99, body extent -5.65,-3.67 5.65,4.03, height 3.26
LoRa-CC68-868-TCXO-Footprint-1 [mm]
  oval 3.4x1.2 smd: 1(-8,7) 2(-8,5) 3(-8,3) 4(-8,1) 5(-8,-1) 6(-8,-3) 7(-8,-5) 8(-8,-7) 9(8,-7) 10(8,-5) 11(8,-3) 12(8,-1) 13(8,1) 14(8,3) 15(8,5) 16(8,7)
  silkscreen extent -8,-8.3 8,8.3, body extent -8,-8 8,8, height 2.1
MCC-SOD-123FL_V [mil] "SODFL, 2-Leads, Body 3.1x1.9mm"
  rect 36x48 smd: 1(-64.5,0) 2(64.5,0)
  silkscreen extent 102,-32 102,32, body extent -73,-37 73,37, height 47
MLT-5020 [mm]
  rect 1.8x1 smd: 1(-1.9,-1.75) 2(1.9,-1.75) 3(-1.9,1.75)
  silkscreen extent -2.65,-2.65 2.65,2.65, body extent -2.5,-2.5 2.5,2.5, height 2
PHOENIX_1771088 [mm]
  rect 1.4x3.4 smd: 1(1.5,10.3) 2(4,10.3) 3(6.5,10.3) 4(9,10.3) 5(11.5,10.3) 6(14,10.3) 7(16.5,10.3) 8(19,10.3)
  rect 2.3x5.6 smd: SH1(-1.15,3.7) SH2(21.65,3.7)
  silkscreen extent 0,0 20.5,12.85, body extent -1.95,0 22.45,11, height 5.11
QFP50P1200X1200X160-64N [mm]
  rect 1.475x0.3 smd: 1(-5.738,3.75) 2(-5.738,3.25) 3(-5.738,2.75) 4(-5.738,2.25) 5(-5.738,1.75) 6(-5.738,1.25) 7(-5.738,0.75) 8(-5.738,0.25) 9(-5.738,-0.25) 10(-5.738,-0.75) 11(-5.738,-1.25) 12(-5.738,-1.75) 13(-5.738,-2.25) 14(-5.738,-2.75) 15(-5.738,-3.25) 16(-5.738,-3.75) 33(5.738,-3.75) 34(5.738,-3.25) 35(5.738,-2.75) 36(5.738,-2.25) 37(5.738,-1.75) 38(5.738,-1.25) 39(5.738,-0.75) 40(5.738,-0.25) 41(5.738,0.25) 42(5.738,0.75) 43(5.738,1.25) 44(5.738,1.75) 45(5.738,2.25) 46(5.738,2.75) 47(5.738,3.25) 48(5.738,3.75)
  rect 0.3x1.475 smd: 17(-3.75,-5.738) 18(-3.25,-5.738) 19(-2.75,-5.738) 20(-2.25,-5.738) 21(-1.75,-5.738) 22(-1.25,-5.738) 23(-0.75,-5.738) 24(-0.25,-5.738) 25(0.25,-5.738) 26(0.75,-5.738) 27(1.25,-5.738) 28(1.75,-5.738) 29(2.25,-5.738) 30(2.75,-5.738) 31(3.25,-5.738) 32(3.75,-5.738) 49(3.75,5.738) 50(3.25,5.738) 51(2.75,5.738) 52(2.25,5.738) 53(1.75,5.738) 54(1.25,5.738) 55(0.75,5.738) 56(0.25,5.738) 57(-0.25,5.738) 58(-0.75,5.738) 59(-1.25,5.738) 60(-1.75,5.738) 61(-2.25,5.738) 62(-2.75,5.738) 63(-3.25,5.738) 64(-3.75,5.738)
  silkscreen extent -6.35,-4.65 4.65,4.65, body extent -6,-6 6,6, height 1.6
RES-0402 [mm] "Chip Resistor, 2-Leads, Body 1.00x0.50mm, IPC Medium Density"
  rect 0.6x0.55 smd: 1(-0.45,0) 2(0.45,0)
  body extent -0.55,-0.28 0.55,0.28, height 0.4
RES-0603 [mm] "Chip Resistor, 2-Leads, Body 1.60x0.80mm, IPC Medium Density"
  rect 0.95x0.9 smd: 1(-0.725,0) 2(0.725,0)
  body extent -0.85,-0.45 0.85,0.45, height 0.55
SOIC127P790X216-8N [mm]
  rrect25% 1.61x0.58 smd: 1(-3.605,1.905) 2(-3.605,0.635) 3(-3.605,-0.635) 4(-3.605,-1.905) 5(3.605,-1.905) 6(3.605,-0.635) 7(3.605,0.635) 8(3.605,1.905)
  silkscreen extent -5.31,-2.64 2.64,2.64, body extent -3.95,-2.64 3.95,2.64, height 2.16
SOT95P245X110-3N [mm] "SOT23, 3-Leads, Body 2.90x2.45mm, Pitch 0.95mm, IPC Medium Density"
  rect 1x0.6 smd: 1(-1.2,0.95) 2(-1.2,-0.95) 3(1.2,0)
  silkscreen extent -1.33,-1.5 0.7,1.92, body extent -0.7,-1.5 0.7,1.5, height 1.1
SOT230P700X180-4N [mm]
  rect 2.75x0.95 smd: 1(-2.6,2.3) 2(-2.6,0) 3(-2.6,-2.3)
  rect 2.75x3.25 smd: 4(2.6,0)
  silkscreen extent -3.98,-3.25 0.87,3.25
TECO-MS560702BA03-50_V [mm] "SMD, 8-Leads, Body 3x5mm, Pitch 1.25mm"
  rect 1.1x0.6 smd: 1(-1.1,1.875) 2(-1.1,0.625) 3(-1.1,-0.625) 4(-1.1,-1.875) 5(1.1,-1.875) 6(1.1,-0.625) 7(1.1,0.625) 8(1.1,1.875)
  silkscreen extent -2.33,-2.5 0.32,2.5, body extent -1.5,-2.5 1.5,2.5, height 1
THRMC1608X95N [mm]
  rect 0.98x0.97 smd: 1(-0.745,0) 2(0.745,0)
  body extent -0.8,-0.4 0.8,0.4, height 0.45
TI-DBV5_M [mm] "SOT23, 5-Leads, Body 2.9x1.6mm, Pitch 0.95mm, IPC Low Density"
  rect 1.3x0.7 smd: 1(-1.2,0.95) 2(-1.2,0) 3(-1.2,-0.95) 4(1.2,-0.95) 5(1.2,0.95)
  silkscreen extent -1.32,-1.55 0.15,1.98, body extent -0.87,-1.52 0.87,1.53, height 1.45
TP-1.5-Footprint-1 [mil]
  round 60 smd: 1(0,0)
TPS22811LRPWR-Footprint-1 [mil]
  round 1 smd: 1(-28.54,27.56) 2(-28.54,8.86) 3(-28.54,-8.86) 4(-28.54,-27.56) 5(-9.84,0) 6(9.84,0) 7(28.54,-27.56) 8(28.54,-8.86) 9(28.54,8.86) 10(28.54,27.56)
  Top region: -45.28,21.65 -46.03,21.8 -46.67,22.23 -47.09,22.87 -47.24,23.62 -47.24,23.62 -47.24,31.5 -47.09,32.25 -46.67,32.89 -46.03,33.31 -45.28,33.46 -45.28,33.46 -33.46,33.46 -33.46,45.28 -33.31,46.03 -32.89,46.67 -32.25,47.09 -31.5,47.24 -31.5,47.24 -25.59,47.24 -25.59,47.24 -24.84,47.09 -24.2,46.67 -23.77,46.03 -23.62,45.28 -23.62,45.28 -23.62,45.28 -23.62,23.62 -23.62,23.62 -23.77,22.87 -24.2,22.23 -24.84,21.8 -25.59,21.65 -25.59,21.65
  Top region: -45.28,3.94 -46.03,4.09 -46.67,4.51 -47.09,5.15 -47.24,5.91 -47.24,5.91 -47.24,11.81 -47.09,12.56 -46.67,13.2 -46.03,13.63 -45.28,13.78 -45.28,13.78 -25.59,13.78 -25.59,13.78 -24.84,13.63 -24.2,13.2 -23.77,12.56 -23.62,11.81 -23.62,11.81 -23.62,11.81 -23.62,5.91 -23.62,5.91 -23.77,5.15 -24.2,4.51 -24.84,4.09 -25.59,3.94 -25.59,3.94
  Top region: -47.24,-11.81 -47.24,-5.91 -47.09,-5.15 -46.67,-4.51 -46.03,-4.09 -45.28,-3.94 -45.28,-3.94 -25.59,-3.94 -25.59,-3.94 -24.84,-4.09 -24.2,-4.51 -23.77,-5.15 -23.62,-5.91 -23.62,-5.91 -23.62,-5.91 -23.62,-11.81 -23.62,-11.81 -23.77,-12.56 -24.2,-13.2 -24.84,-13.63 -25.59,-13.78 -25.59,-13.78 -25.59,-13.78 -45.28,-13.78 -46.03,-13.63 -46.67,-13.2 -47.09,-12.56 -47.24,-11.81
  Top region: -45.28,-33.46 -46.03,-33.31 -46.67,-32.89 -47.09,-32.25 -47.24,-31.5 -47.24,-31.5 -47.24,-23.62 -47.09,-22.87 -46.67,-22.23 -46.03,-21.8 -45.28,-21.65 -45.28,-21.65 -25.59,-21.65 -24.61,-21.92 -23.89,-22.64 -23.62,-23.62 -23.62,-23.62 -23.62,-45.28 -23.62,-45.28 -23.77,-46.03 -24.2,-46.67 -24.84,-47.09 -25.59,-47.24 -25.59,-47.24 -25.59,-47.24 -31.5,-47.24 -32.25,-47.09 -32.89,-46.67 -33.31,-46.03 -33.46,-45.28 -33.46,-45.28 -33.46,-33.46
  Top region: 23.62,-45.28 23.77,-46.03 24.2,-46.67 24.84,-47.09 25.59,-47.24 25.59,-47.24 25.59,-47.24 31.5,-47.24 32.25,-47.09 32.89,-46.67 33.31,-46.03 33.46,-45.28 33.46,-45.28 33.46,-33.46 45.28,-33.46 46.03,-33.31 46.67,-32.89 47.09,-32.25 47.24,-31.5 47.24,-31.5 47.24,-23.62 46.98,-22.64 46.26,-21.92 45.28,-21.65 45.28,-21.65 25.59,-21.65 25.59,-21.65 24.84,-21.8 24.2,-22.23 23.77,-22.87 23.62,-23.62 23.62,-23.62 23.62,-23.62
  Top region: 23.62,-11.81 23.62,-5.91 23.62,-5.91 23.89,-4.92 24.61,-4.2 25.59,-3.94 25.59,-3.94 45.28,-3.94 46.03,-4.09 46.67,-4.51 47.09,-5.15 47.24,-5.91 47.24,-5.91 47.24,-11.81 47.09,-12.56 46.67,-13.2 46.03,-13.63 45.28,-13.78 45.28,-13.78 25.59,-13.78 25.59,-13.78 24.84,-13.63 24.2,-13.2 23.77,-12.56 23.62,-11.81
  Top region: 23.62,5.91 23.62,11.81 23.62,11.81 23.89,12.8 24.61,13.52 25.59,13.78 25.59,13.78 25.59,13.78 45.28,13.78 46.03,13.63 46.67,13.2 47.09,12.56 47.24,11.81 47.24,11.81 47.24,5.91 47.09,5.15 46.67,4.51 46.03,4.09 45.28,3.94 45.28,3.94 25.59,3.94 24.84,4.09 24.2,4.51 23.77,5.15 23.62,5.91
  Top region: 23.62,23.62 23.77,22.87 24.2,22.23 24.84,21.8 25.59,21.65 25.59,21.65 45.28,21.65 46.03,21.8 46.67,22.23 47.09,22.87 47.24,23.62 47.24,23.62 47.24,31.5 47.09,32.25 46.67,32.89 46.03,33.31 45.28,33.46 45.28,33.46 33.46,33.46 33.46,45.28 33.31,46.03 32.89,46.67 32.25,47.09 31.5,47.24 31.5,47.24 25.59,47.24 25.59,47.24 24.61,46.98 23.89,46.26 23.62,45.28 23.62,45.28 23.62,45.28
  Top region: -15.75,-45.28 -15.75,45.28 -15.6,46.03 -15.17,46.67 -14.53,47.09 -13.78,47.24 -13.78,47.24 -5.91,47.24 -5.15,47.09 -4.51,46.67 -4.09,46.03 -3.94,45.28 -3.94,45.28 -3.94,-45.28 -4.09,-46.03 -4.51,-46.67 -5.15,-47.09 -5.91,-47.24 -5.91,-47.24 -13.78,-47.24 -14.53,-47.09 -15.17,-46.67 -15.6,-46.03 -15.75,-45.28
  Top region: 3.94,-45.28 3.94,45.28 4.09,46.03 4.51,46.67 5.15,47.09 5.91,47.24 5.91,47.24 13.78,47.24 14.53,47.09 15.17,46.67 15.6,46.03 15.75,45.28 15.75,45.28 15.75,-45.28 15.6,-46.03 15.17,-46.67 14.53,-47.09 13.78,-47.24 13.78,-47.24 5.91,-47.24 5.15,-47.09 4.51,-46.67 4.09,-46.03 3.94,-45.28
  silkscreen extent -60,50 -50,60, body extent -39,-39 39,39, height 39
XL-1615RGBC-WS2812B-Footprint-1 [mm]
  rect 0.8x0.65 smd: 1(-0.725,0.425) 2(0.725,0.425) 3(-0.725,-0.425) 4(0.725,-0.425)
  body extent -0.8,-0.75 0.8,0.75, height 0.65

## Part data
B1: library part CMP-020-00025-2, "ARM Microcontrollers - MCU 16/32-BITS MICROS", JLCPCB Part Number=C94351, Manufacturer=STMicroelectronics, Mouser Part Number=511-STM32F412RGT6, Arrow Part Number=STM32F412RGT6, Arrow Price/Stock=https://www.arrow.com/en/products/stm32f412rgt6/stmicroelectronics?region=nac, Datasheet Link=http://www.st.com/content/ccc/resource/technical/document/datasheet/15/90/07/b3/8c/10/4e/95/DM00213872.pdf/files/DM00213872.pdf/jcr:content/translations/en.DM00213872.pdf, Design Item ID=STM32F412RGT6, Geometry.Height=1.6mm, Manufacturer_Part_Number=STM32F412RGT6, Mouser Price/Stock=https://www.mouser.co.uk/ProductDetail/STMicroelectronics/STM32F412RGT6?qs=qzCNEk%252BRr%252Bb0WoPVhlRQfQ%3D%3D, Source=STM32F412RGT6.SchLib
B2: library part CMP-172-000000-1, "STMICROELECTRONICS - LDL1117S33R - LDO, FIXED, 3.3V, 1.2A, SOT-223-3", JLC Basic Part=No, JLCPCB Part #=C435835, Manufacturer_Name=STMicroelectronics, Mouser Part Number=511-LDL1117S33R, Datasheet Link=https://componentsearchengine.com/Datasheets/2/LDL1117S33R.pdf, Design Item ID=LDL1117S33R, Geometry.Height=1.8mm, Manufacturer_Part_Number=LDL1117S33R, Mouser Price/Stock=https://www.mouser.co.uk/ProductDetail/STMicroelectronics/LDL1117S33R?qs=AQlKX63v8Rt9Bf6AWSrbFg%3D%3D, Source=LDL1117S33R.SchLib
BT1: library part CMP-002-00103-1, "Batteries/Accessories", RoHS Compliant=Yes
C1 C4 C10 C11 C12 C13 C14 C18 C21: library part CMP-001-00142-1, "Capacitor, Ceramic (MLCC), 100nF, ±10%, 16V, X7R, ±10%, SMD 0402", Case/Package=0402, JLCPCB Basic Part=Yes, JLCPCB Part Number=C1525, Manufacturer="Samsung Electro-Mechanics", Temperature Coefficient=X7R, Tolerance=10%, Voltage Rating=16V, Category="Capacitors - MLCC", ComponentLink1Description=Datasheet, ComponentLink1URL=https://datasheet.lcsc.com/lcsc/1810191219_Samsung-Electro-Mechanics-CL05B104KO5NNNC_C1525.pdf, ComponentLink2Description="JLCPCB Part URL", ComponentLink2URL=https://jlcpcb.com/partdetail/C1525, ComponentLink3Description="LCSC Part URL", ComponentLink3URL=https://lcsc.com/product-detail/Multilayer-Ceramic-Capacitors-MLCC---SMD-SMT_Samsung-Electro-Mechanics-Samsung-Electro-Mechanics-CL05B104KO5NNNC_C1525.html, Design Item ID=CL05B104KO5NNNC, Manufacturer Part Number=CL05B104KO5NNNC, RoHS=Yes, Source=jlcpcb_capacitors_basic.schlib
C2 C20: library part CMP-001-00135-1, "Capacitor, Ceramic (MLCC), 1uF, ±10%, 25V, X5R, ±10%, SMD 0402", Case/Package=0402, JLCPCB Basic Part=Yes, JLCPCB Part Number=C52923, Manufacturer="Samsung Electro-Mechanics", Temperature Coefficient=X5R, Tolerance=10%, Voltage Rating=25V, Category="Capacitors - MLCC", ComponentLink1Description=Datasheet, ComponentLink1URL=https://datasheet.lcsc.com/lcsc/1811091611_Samsung-Electro-Mechanics-CL05A105KA5NQNC_C52923.pdf, ComponentLink2Description="JLCPCB Part URL", ComponentLink2URL=https://jlcpcb.com/partdetail/C52923, ComponentLink3Description="LCSC Part URL", ComponentLink3URL=https://lcsc.com/product-detail/Multilayer-Ceramic-Capacitors-MLCC---SMD-SMT_Samsung-Electro-Mechanics-Samsung-Electro-Mechanics-CL05A105KA5NQNC_C52923.html, Design Item ID=CL05A105KA5NQNC, Manufacturer Part Number=CL05A105KA5NQNC, RoHS=Yes, Source=jlcpcb_capacitors_basic.schlib
C3 C9 C19: library part CMP-001-00139-1, "Capacitor, Ceramic (MLCC), 4.7uF, ±20%, 10V, X5R, ±20%, SMD 0402", Case/Package=0402, JLCPCB Basic Part=Yes, JLCPCB Part Number=C23733, Manufacturer="Samsung Electro-Mechanics", Temperature Coefficient=X5R, Tolerance=20%, Voltage Rating=10V, Category="Capacitors - MLCC", ComponentLink1Description=Datasheet, ComponentLink1URL=https://datasheet.lcsc.com/lcsc/1810191211_Samsung-Electro-Mechanics-CL05A475MP5NRNC_C23733.pdf, ComponentLink2Description="JLCPCB Part URL", ComponentLink2URL=https://jlcpcb.com/partdetail/C23733, ComponentLink3Description="LCSC Part URL", ComponentLink3URL=https://lcsc.com/product-detail/Multilayer-Ceramic-Capacitors-MLCC---SMD-SMT_Samsung-Electro-Mechanics-Samsung-Electro-Mechanics-CL05A475MP5NRNC_C23733.html, Design Item ID=CL05A475MP5NRNC, Manufacturer Part Number=CL05A475MP5NRNC, RoHS=Yes, Source=jlcpcb_capacitors_basic.schlib
C5 C6: library part CMP-001-02165-2, "50V 4.3pF NP0 0402  Multilayer Ceramic Capacitors MLCC - SMD/SMT ROHS", JLCPCB Part Number=C147367
C7 C8: library part CMP-001-02164-2, "50V 6pF C0G 0402  Multilayer Ceramic Capacitors MLCC - SMD/SMT ROHS", JLCPCB Part Number=C1575
C15: library part CMP-001-00149-1, "Capacitor, Ceramic (MLCC), 10uF, ±10%, 10V, X5R, ±10%, SMD 0603", Case/Package=0603, JLCPCB Basic Part=Yes, JLCPCB Part Number=C19702, Manufacturer="Samsung Electro-Mechanics", Temperature Coefficient=X5R, Tolerance=10%, Voltage Rating=10V, Category="Capacitors - MLCC", ComponentLink1Description=Datasheet, ComponentLink1URL=https://datasheet.lcsc.com/lcsc/1810191219_Samsung-Electro-Mechanics-CL10A106KP8NNNC_C19702.pdf, ComponentLink2Description="JLCPCB Part URL", ComponentLink2URL=https://jlcpcb.com/partdetail/C19702, ComponentLink3Description="LCSC Part URL", ComponentLink3URL=https://lcsc.com/product-detail/Multilayer-Ceramic-Capacitors-MLCC---SMD-SMT_Samsung-Electro-Mechanics-Samsung-Electro-Mechanics-CL10A106KP8NNNC_C19702.html, Design Item ID=CL10A106KP8NNNC, Manufacturer Part Number=CL10A106KP8NNNC, RoHS=Yes, Source=jlcpcb_capacitors_basic.schlib
C16 C22 C23 C24 C25 C28 C29: library part CMP-001-00178-1, "Capacitor, Ceramic (MLCC), 100nF, ±10%, 50V, X7R, ±10%, SMD 0603", Case/Package=0603, JLCPCB Basic Part=Yes, JLCPCB Part Number=C14663, Manufacturer=YAGEO, Temperature Coefficient=X7R, Tolerance=10%, Voltage Rating=50V, Category="Capacitors - MLCC", ComponentLink1Description=Datasheet, ComponentLink1URL=https://datasheet.lcsc.com/lcsc/1809301912_YAGEO-CC0603KRX7R9BB104_C14663.pdf, ComponentLink2Description="JLCPCB Part URL", ComponentLink2URL=https://jlcpcb.com/partdetail/C14663, ComponentLink3Description="LCSC Part URL", ComponentLink3URL=https://lcsc.com/product-detail/Multilayer-Ceramic-Capacitors-MLCC---SMD-SMT_YAGEO-YAGEO-CC0603KRX7R9BB104_C14663.html, Design Item ID=CC0603KRX7R9BB104, Manufacturer Part Number=CC0603KRX7R9BB104, RoHS=Yes, Source=jlcpcb_capacitors_basic.schlib
C17: library part CMP-001-00136-1, "Capacitor, Ceramic (MLCC), 10uF, ±20%, 6.3V, X5R, ±20%, SMD 0402", Case/Package=0402, JLCPCB Basic Part=Yes, JLCPCB Part Number=C15525, Manufacturer="Samsung Electro-Mechanics", Temperature Coefficient=X5R, Tolerance=20%, Voltage Rating=6.3V, Category="Capacitors - MLCC", ComponentLink1Description=Datasheet, ComponentLink1URL=https://datasheet.lcsc.com/lcsc/2208231630_Samsung-Electro-Mechanics-CL05A106MQ5NUNC_C15525.pdf, ComponentLink2Description="JLCPCB Part URL", ComponentLink2URL=https://jlcpcb.com/partdetail/C15525, ComponentLink3Description="LCSC Part URL", ComponentLink3URL=https://lcsc.com/product-detail/Multilayer-Ceramic-Capacitors-MLCC---SMD-SMT_Samsung-Electro-Mechanics-Samsung-Electro-Mechanics-CL05A106MQ5NUNC_C15525.html, Design Item ID=CL05A106MQ5NUNC, Manufacturer Part Number=CL05A106MQ5NUNC, RoHS=Yes, Source=jlcpcb_capacitors_basic.schlib
C26 C33 C36_CH1 C36_CH2 C37_CH1 C37_CH2: library part CMP-001-00151-1, "Capacitor, Ceramic (MLCC), 2.2uF, ±10%, 16V, X5R, ±10%, SMD 0603", Case/Package=0603, JLCPCB Basic Part=Yes, JLCPCB Part Number=C23630, Manufacturer="Samsung Electro-Mechanics", Temperature Coefficient=X5R, Tolerance=10%, Voltage Rating=16V, Category="Capacitors - MLCC", ComponentLink1Description=Datasheet, ComponentLink1URL=https://datasheet.lcsc.com/lcsc/1810271109_Samsung-Electro-Mechanics-CL10A225KO8NNNC_C23630.pdf, ComponentLink2Description="JLCPCB Part URL", ComponentLink2URL=https://jlcpcb.com/partdetail/C23630, ComponentLink3Description="LCSC Part URL", ComponentLink3URL=https://lcsc.com/product-detail/Multilayer-Ceramic-Capacitors-MLCC---SMD-SMT_Samsung-Electro-Mechanics-Samsung-Electro-Mechanics-CL10A225KO8NNNC_C23630.html, Design Item ID=CL10A225KO8NNNC, Manufacturer Part Number=CL10A225KO8NNNC, RoHS=Yes, Source=jlcpcb_capacitors_basic.schlib
C27 C32: library part CMP-001-00148-1, "Capacitor, Ceramic (MLCC), 1uF, ±10%, 50V, X5R, ±10%, SMD 0603", Case/Package=0603, JLCPCB Basic Part=Yes, JLCPCB Part Number=C15849, Manufacturer="Samsung Electro-Mechanics", Temperature Coefficient=X5R, Tolerance=10%, Voltage Rating=50V, Category="Capacitors - MLCC", ComponentLink1Description=Datasheet, ComponentLink1URL=https://datasheet.lcsc.com/lcsc/1810261812_Samsung-Electro-Mechanics-CL10A105KB8NNNC_C15849.pdf, ComponentLink2Description="JLCPCB Part URL", ComponentLink2URL=https://jlcpcb.com/partdetail/C15849, ComponentLink3Description="LCSC Part URL", ComponentLink3URL=https://lcsc.com/product-detail/Multilayer-Ceramic-Capacitors-MLCC---SMD-SMT_Samsung-Electro-Mechanics-Samsung-Electro-Mechanics-CL10A105KB8NNNC_C15849.html, Design Item ID=CL10A105KB8NNNC, Manufacturer Part Number=CL10A105KB8NNNC, RoHS=Yes, Source=jlcpcb_capacitors_basic.schlib
C30 C31 C34_CH1 C34_CH2 C35_CH1 C35_CH2: library part CMP-001-00152-1, "Capacitor, Ceramic (MLCC), 22uF, ±20%, 6.3V, X5R, ±20%, SMD 0603", Case/Package=0603, JLCPCB Basic Part=Yes, JLCPCB Part Number=C59461, Manufacturer="Samsung Electro-Mechanics", Temperature Coefficient=X5R, Tolerance=20%, Voltage Rating=6.3V, Category="Capacitors - MLCC", ComponentLink1Description=Datasheet, ComponentLink1URL=https://datasheet.lcsc.com/lcsc/1811151138_Samsung-Electro-Mechanics-CL10A226MQ8NRNC_C59461.pdf, ComponentLink2Description="JLCPCB Part URL", ComponentLink2URL=https://jlcpcb.com/partdetail/C59461, ComponentLink3Description="LCSC Part URL", ComponentLink3URL=https://lcsc.com/product-detail/Multilayer-Ceramic-Capacitors-MLCC---SMD-SMT_Samsung-Electro-Mechanics-Samsung-Electro-Mechanics-CL10A226MQ8NRNC_C59461.html, Design Item ID=CL10A226MQ8NRNC, Manufacturer Part Number=CL10A226MQ8NRNC, RoHS=Yes, Source=jlcpcb_capacitors_basic.schlib
C38 C39: library part CMP-001-01728-1, "Capacitor, Ceramic (MLCC), 1uF, ±10%, 10V, X7S, ±10%, SMD 0402", Case/Package=0402, JLCPCB Basic Part=No, JLCPCB Part Number=C437522, Manufacturer="Murata Electronics", Temperature Coefficient=X7S, Tolerance=10%, Voltage Rating=10V, Category="Capacitors - MLCC", ComponentLink1Description=Datasheet, ComponentLink1URL=https://datasheet.lcsc.com/lcsc/2001071206_Murata-Electronics-GRM155C71A105KE11D_C437522.pdf, ComponentLink2Description="JLCPCB Part URL", ComponentLink2URL=https://jlcpcb.com/partdetail/C437522, ComponentLink3Description="LCSC Part URL", ComponentLink3URL=https://lcsc.com/product-detail/Multilayer-Ceramic-Capacitors-MLCC---SMD-SMT_Murata-Electronics-Murata-Electronics-GRM155C71A105KE11D_C437522.html, Design Item ID=GRM155C71A105KE11D, Manufacturer Part Number=GRM155C71A105KE11D, RoHS=Yes, Source=jlcpcb_capacitors_extended_0402.schlib
D1 D2: library part CMP-004-00034-1, "DIODE GEN PURP 1KV 1A SOD123FL", JLCPCB Part Number=C64898, LCSC Part #=C64898
D3 DS1: library part CMP-00026-00001-1, "SZYY0603R", JLCPCB Part Number=C2286
D4: library part CMP-004-00036-1, "40V 600mV@1A 1A SOD-323  Schottky Barrier Diodes (SBD) ROHS", JLCPCB Part Number=C191023
D5: library part CMP-004-00034-1, "DIODE GEN PURP 1KV 1A SOD123FL", LCSC Part #=C64898
F1: library part CMP-005-00000-3, "PTC Resettable Fuse, 15 V, 500 mA, -40 to 85 degC, 2-Pin SMD, RoHS, Tape and Reel", Case/Package=MF-MSMF050-2, Current Rating=100A, Manufacturer=Bourns, Max Operating Temperature=85°C, Min Operating Temperature=-40°C, Package Description="2-Pin Surface Mount Device, Body 4.55 x 3.24 mm", Datasheet URL=http://www.bourns.com/data/global/pdfs/mfmsmf.pdf, Datasheet Version="Rev. AG, 08/2016", Mounting Technology=SM, Package Reference=MF-MSMF050-2, Packaging=TapeandReel, RoHS Compliant=False
FB1: library part CMP-006-00022-1, "520mΩ ±25% 600Ω@100MHz 0402  Ferrite Beads ROHS", Case Code=0402, Current Rating=300mA, DC Resistance-Max=520mR, JLCPCB Part Number=C76884, Max Operating Temperature=125°C, Min Operating Temperature=-55°C, Construction="Chip Bead", Mounting Technology="Surface Mount", RoHS Compliant=Yes
J1: library part CMP-002-00088-4, "AVX edge to edge connector 10pin"
J2: library part CMP-002-00099-1, "USB Connector, 16 Contact(s), Male, Right Angle, Surface Mount Terminal, Locking, Receptacle", JLCPCB Part Number=C5187472
J3: library part CMP-153-000000-2, "PTSM 0,5/ 8-2,5-H SMD R44 - PCB terminal block", Manufacturer="Phoenix Contact", Design Item ID=1771088, MP=1771088, Pin Count=8
J4: library part CMP-161-000000-1, Package=None, Availability=Unavailable, Component Type=Standard, Design Item ID=20021321-00016C4LF, MP=20021321-00016C4LF, Pin Count=16, Price=None, Source=20021321-00016C4LF.SchLib
J5 J6: library part CMP-002-00096-1, "RF SMA Connector, 1 Contact(s), Female, Board Mount, Surface Mount Terminal, Locking, Jack", Max Operating Temperature=125°C, Min Operating Temperature=-65°C, Connector Type=SMA, Mounting Technology=Board, RoHS Compliant=Yes
LS1: library part CMP-00027-00002-1, "Externally Driven Magnetic 4000Hz SMD,5x5mm  Buzzers ROHS", JLCPCB Part Number=C94598
M2: library part CMP-00004-2, "Fixed Positive LDO Regulator, 3.3V, 0.68V Dropout, CMOS, PDSO3"
MD1: library part CMP-00025-00006-2, "Telecom Circuit, 1-Func", Max Operating Temperature=85°C, Min Operating Temperature=-40°C, Height - Seated (Max)=2.3mm, Length=10.1mm, Pins=18, RoHS Compliant=Yes
Q1 Q2: library part CMP-013-00038-1, "N沟道 VDS=30V VGS=±12V ID=5.7A P=1.4W", JLCPCB Part Number=C20917
  Q1: LCSC Part #=C20917
Q3 Q4: library part CMP-013-00037-1, "P沟道 VDS=-30V VGS=±12V ID=-4A P=1.4W", JLCPCB Part Number=C15127
R1 R2 R4 R7 R11 R13 R15: library part CMP-009-00191-1, "Resistor, 10kΩ, ±1%, 62.5mW, 50V, ±100ppm/℃, -55℃~+155℃, SMD 0402", Case/Package=0402, JLCPCB Basic Part=Yes, JLCPCB Part Number=C25744, Manufacturer=Uniroyal, Power Rating=62.5mW, Temperature Coefficient=±100ppm/℃, Temperature Rating=-55℃~+155℃, Tolerance=1%, Voltage Rating=50V, Category=Resistors, ComponentLink1Description=Datasheet, ComponentLink1URL=https://datasheet.lcsc.com/lcsc/2206010100_UNI-ROYAL-Uniroyal-Elec-0402WGF1002TCE_C25744.pdf, ComponentLink2Description="JLCPCB Part URL", ComponentLink2URL=https://jlcpcb.com/partdetail/C25744, Design Item ID=0402WGF1002TCE, Manufacturer Part Number=0402WGF1002TCE, Source=jlcpcb_resistors_basic.schlib
R3: library part CMP-009-00218-1, "Resistor, 300Ω, ±1%, 62.5mW, 50V, ±100ppm/℃, -55℃~+155℃, SMD 0402", Case/Package=0402, JLCPCB Basic Part=Yes, JLCPCB Part Number=C25102, Manufacturer=Uniroyal, Power Rating=62.5mW, Temperature Coefficient=±100ppm/℃, Temperature Rating=-55℃~+155℃, Tolerance=1%, Voltage Rating=50V, Category=Resistors, ComponentLink1Description=Datasheet, ComponentLink1URL=https://datasheet.lcsc.com/lcsc/2205311900_UNI-ROYAL-Uniroyal-Elec-0402WGF3000TCE_C25102.pdf, ComponentLink2Description="JLCPCB Part URL", ComponentLink2URL=https://jlcpcb.com/partdetail/C25102, Design Item ID=0402WGF3000TCE, Manufacturer Part Number=0402WGF3000TCE, Source=jlcpcb_resistors_basic.schlib
R5 R12 R16 R17 R18 R19: library part CMP-009-00211-1, "Resistor, 2.2kΩ, ±1%, 62.5mW, 50V, ±100ppm/℃, -55℃~+155℃, SMD 0402", Case/Package=0402, JLCPCB Basic Part=Yes, JLCPCB Part Number=C25879, Manufacturer=Uniroyal, Power Rating=62.5mW, Temperature Coefficient=±100ppm/℃, Temperature Rating=-55℃~+155℃, Tolerance=1%, Voltage Rating=50V, Category=Resistors, ComponentLink1Description=Datasheet, ComponentLink1URL=https://datasheet.lcsc.com/lcsc/2206010045_UNI-ROYAL-Uniroyal-Elec-0402WGF2201TCE_C25879.pdf, ComponentLink2Description="JLCPCB Part URL", ComponentLink2URL=https://jlcpcb.com/partdetail/C25879, Design Item ID=0402WGF2201TCE, Manufacturer Part Number=0402WGF2201TCE, Source=jlcpcb_resistors_basic.schlib
R6 R14: library part CMP-009-00210-1, "Resistor, 220Ω, ±1%, 62.5mW, 50V, ±100ppm/℃, -55℃~+155℃, SMD 0402", Case/Package=0402, JLCPCB Basic Part=Yes, JLCPCB Part Number=C25091, Manufacturer=Uniroyal, Power Rating=62.5mW, Temperature Coefficient=±100ppm/℃, Temperature Rating=-55℃~+155℃, Tolerance=1%, Voltage Rating=50V, Category=Resistors, ComponentLink1Description=Datasheet, ComponentLink1URL=https://datasheet.lcsc.com/lcsc/2205311900_UNI-ROYAL-Uniroyal-Elec-0402WGF2200TCE_C25091.pdf, ComponentLink2Description="JLCPCB Part URL", ComponentLink2URL=https://jlcpcb.com/partdetail/C25091, Design Item ID=0402WGF2200TCE, Manufacturer Part Number=0402WGF2200TCE, Source=jlcpcb_resistors_basic.schlib
R8 R9: library part CMP-009-00235-1, "Resistor, 5.1kΩ, ±1%, 62.5mW, 50V, ±100ppm/℃, -55℃~+155℃, SMD 0402", Case/Package=0402, JLCPCB Basic Part=Yes, JLCPCB Part Number=C25905, Manufacturer=Uniroyal, Power Rating=62.5mW, Temperature Coefficient=±100ppm/℃, Temperature Rating=-55℃~+155℃, Tolerance=1%, Voltage Rating=50V, Category=Resistors, ComponentLink1Description=Datasheet, ComponentLink1URL=https://datasheet.lcsc.com/lcsc/2206010045_UNI-ROYAL-Uniroyal-Elec-0402WGF5101TCE_C25905.pdf, ComponentLink2Description="JLCPCB Part URL", ComponentLink2URL=https://jlcpcb.com/partdetail/C25905, Design Item ID=0402WGF5101TCE, Manufacturer Part Number=0402WGF5101TCE, Source=jlcpcb_resistors_basic.schlib
R10: library part CMP-009-00248-1, "Resistor, 0Ω, ±1%, 100mW, 75V, -55℃~+155℃, SMD 0603", Case/Package=0603, JLCPCB Basic Part=Yes, JLCPCB Part Number=C21189, Manufacturer=Uniroyal, Power Rating=100mW, Temperature Rating=-55℃~+155℃, Tolerance=1%, Voltage Rating=75V, Category=Resistors, ComponentLink1Description=Datasheet, ComponentLink1URL=https://datasheet.lcsc.com/lcsc/2206010130_UNI-ROYAL-Uniroyal-Elec-0603WAF0000T5E_C21189.pdf, ComponentLink2Description="JLCPCB Part URL", ComponentLink2URL=https://jlcpcb.com/partdetail/C21189, Design Item ID=0603WAF0000T5E, Manufacturer Part Number=0603WAF0000T5E, Source=jlcpcb_resistors_basic.schlib
R22 R23 R24 R30 R38_CH1 R38_CH2: library part CMP-009-00251-1, "Resistor, 10kΩ, ±1%, 100mW, 75V, ±100ppm/℃, -55℃~+155℃, SMD 0603", Case/Package=0603, JLCPCB Basic Part=Yes, JLCPCB Part Number=C25804, Manufacturer=Uniroyal, Power Rating=100mW, Temperature Coefficient=±100ppm/℃, Temperature Rating=-55℃~+155℃, Tolerance=1%, Voltage Rating=75V, Category=Resistors, ComponentLink1Description=Datasheet, ComponentLink1URL=https://datasheet.lcsc.com/lcsc/2206010045_UNI-ROYAL-Uniroyal-Elec-0603WAF1002T5E_C25804.pdf, ComponentLink2Description="JLCPCB Part URL", ComponentLink2URL=https://jlcpcb.com/partdetail/C25804, Design Item ID=0603WAF1002T5E, Manufacturer Part Number=0603WAF1002T5E, Source=jlcpcb_resistors_basic.schlib
R25 R34_CH1 R34_CH2 R35_CH1 R35_CH2 R36_CH1 R36_CH2: library part CMP-009-00325-1, "Resistor, 47kΩ, ±1%, 100mW, 75V, ±100ppm/℃, -55℃~+155℃, SMD 0603", Case/Package=0603, JLCPCB Basic Part=Yes, JLCPCB Part Number=C25819, Manufacturer=Uniroyal, Power Rating=100mW, Temperature Coefficient=±100ppm/℃, Temperature Rating=-55℃~+155℃, Tolerance=1%, Voltage Rating=75V, Category=Resistors, ComponentLink1Description=Datasheet, ComponentLink1URL=https://datasheet.lcsc.com/lcsc/2206010045_UNI-ROYAL-Uniroyal-Elec-0603WAF4702T5E_C25819.pdf, ComponentLink2Description="JLCPCB Part URL", ComponentLink2URL=https://jlcpcb.com/partdetail/C25819, Design Item ID=0603WAF4702T5E, Manufacturer Part Number=0603WAF4702T5E, Source=jlcpcb_resistors_basic.schlib
R26: library part CMP-009-00348-1, "Resistor, 680Ω, ±1%, 100mW, 75V, ±100ppm/℃, -55℃~+155℃, SMD 0603", Case/Package=0603, JLCPCB Basic Part=Yes, JLCPCB Part Number=C23228, Manufacturer=Uniroyal, Power Rating=100mW, Temperature Coefficient=±100ppm/℃, Temperature Rating=-55℃~+155℃, Tolerance=1%, Voltage Rating=75V, Category=Resistors, ComponentLink1Description=Datasheet, ComponentLink1URL=https://datasheet.lcsc.com/lcsc/2206010100_UNI-ROYAL-Uniroyal-Elec-0603WAF6800T5E_C23228.pdf, ComponentLink2Description="JLCPCB Part URL", ComponentLink2URL=https://jlcpcb.com/partdetail/C23228, Design Item ID=0603WAF6800T5E, Manufacturer Part Number=0603WAF6800T5E, Source=jlcpcb_resistors_basic.schlib
R37_CH1 R37_CH2: library part CMP-009-00286-1, "Resistor, 22kΩ, ±1%, 100mW, 75V, ±100ppm/℃, -55℃~+155℃, SMD 0603", Case/Package=0603, JLCPCB Basic Part=Yes, JLCPCB Part Number=C31850, Manufacturer=Uniroyal, Power Rating=100mW, Temperature Coefficient=±100ppm/℃, Temperature Rating=-55℃~+155℃, Tolerance=1%, Voltage Rating=75V, Category=Resistors, ComponentLink1Description=Datasheet, ComponentLink1URL=https://datasheet.lcsc.com/lcsc/2206010030_UNI-ROYAL-Uniroyal-Elec-0603WAF2202T5E_C31850.pdf, ComponentLink2Description="JLCPCB Part URL", ComponentLink2URL=https://jlcpcb.com/partdetail/C31850, Design Item ID=0603WAF2202T5E, Manufacturer Part Number=0603WAF2202T5E, Source=jlcpcb_resistors_basic.schlib
RT1: library part CMP-038-000000-2, "PTC Resettable Fuse: 2A Hold, 4A Trip, 0603", Hold Current=2A, JLCPCB Part Number=C2757930, Package=0603, Trip Current=4A, Availability=Unavailable, Component Type=Standard, Design Item ID=BSMD0603L-200, MP=BSMD0603L-200, Pin Count=2
SW1 SW2: library part CMP-011-00021-3, "Switch Tactile N.O. SPST Rectangular Button Gull Wing 0.05A 12VDC 2.2N SMD Embossed T/R", JLCPCB Part Number=C79167
TP1: library part CMP-00028-00007-2, "1.5mm round", Pins=1